# Altium PCB PCB1.PcbDoc
Units mil, origin at the board's own origin, x right, y up, seen from the top; angles counter-clockwise.
Board outline 6000 x 4000 mil, 2 copper layers (Top Layer, Bottom Layer); 39 components, 24 nets, 113 pads, 0 vias.
Unrouted connection lines stored in the file: 89.
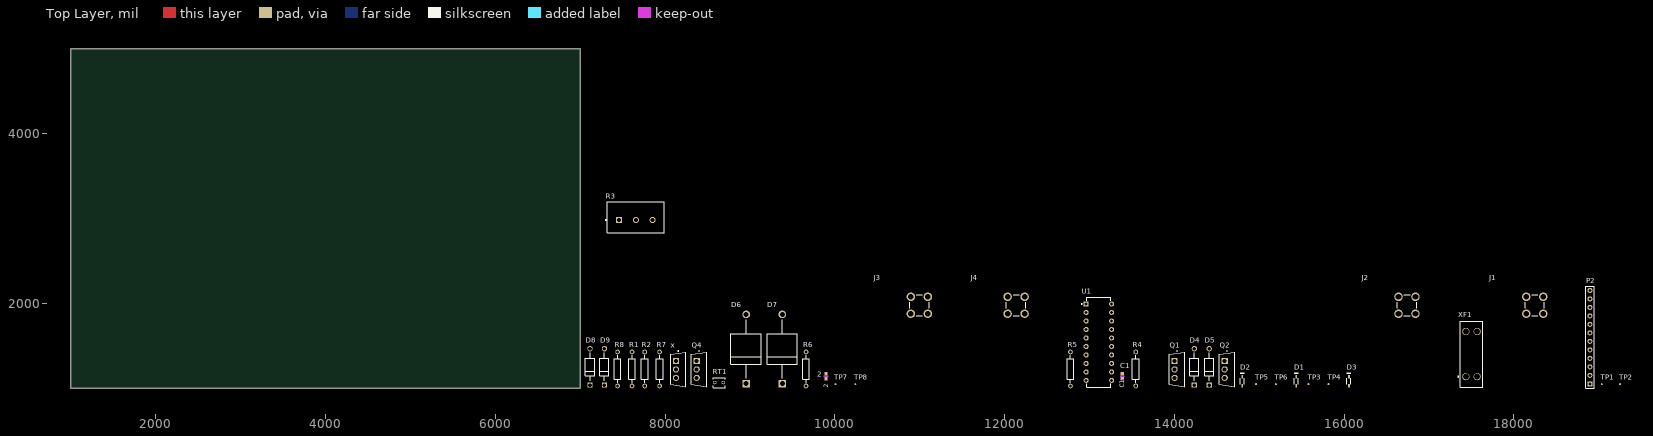
[diagram p0: Top Layer view]
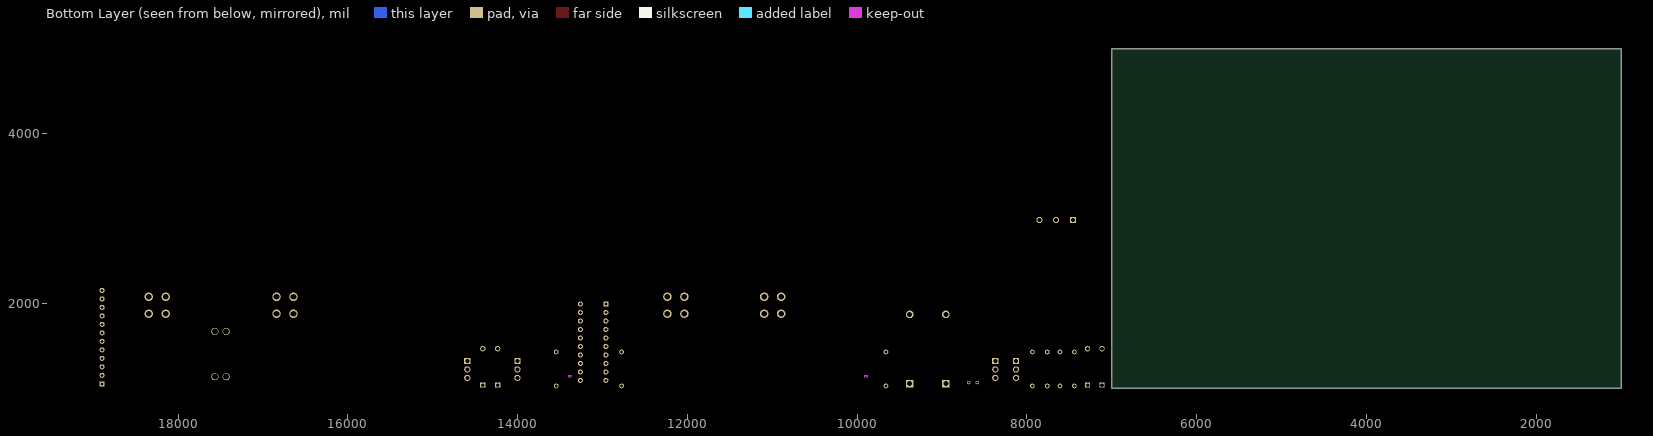
[diagram p1: Bottom Layer view, seen from below]

## Layer stack, top to bottom
Top Solder: solder mask 0.4, Solder Resist, Dk 3.5
Top Layer: signal copper 1.4
Dielectric 1: dielectric 12.6, FR-4, Dk 4.8
Bottom Layer: signal copper 1.4
Bottom Solder: solder mask 0.4, Solder Resist, Dk 3.5

## Board outline
1000,1000 7000,1000 7000,5000 1000,5000

## Design rules (kind name [scope] priority, off if disabled: settings)
Clearance [All] p1: gap=10 ignorepadtopadclearanceinfootprint=FALSE
PolygonConnect [All] p1: connectstyle=Relief reliefconductorwidth=10 reliefentries=4 polygonreliefangle="90 Angle" airgapwidth=10
RoutingVias [All] p1: holewidth=28 width=50 viastyle="Through Hole" minholewidth=28 minwidth=50 maxholewidth=28 maxwidth=50
SolderMaskExpansion [All] p1: expansion=0 istentingtop=FALSE
SupplyNets "Schematic Supply Nets_3" [InNet('+12')] p1: voltage=0.000
SupplyNets "Schematic Supply Nets_2" [InNet('+5')] p2: voltage=0.000
SupplyNets "Schematic Supply Nets_1" [InNet('+24')] p3: voltage=0.000
SupplyNets "Schematic Supply Nets" [InNet('GND')] p4: voltage=0.000
Width [All] p1: maxlimit=10 minlimit=10 preferedwidth=10
30 further rules are at their usual default settings.

## Components (designator, comment, footprint, x,y, rotation, side; value= is the part's Value field where it differs from the comment)
2 "47nF" CAPC17595_95N_KEM 9895,1145 r90 top
C1 "47nF" CAPC17595_95N_KEM 13385,1145 r90 top
D1 "1N4148WS" FAIR-SOD-323_V 15435,1085 r90 top
D2 "1N4148WS" FAIR-SOD-323_V 14800,1085 r90 top
D3 "1N4148WS" FAIR-SOD-323_V 16055,1085 r90 top
D4 "1N5819-E3/54" FP-1N5819-E3-54-MFG 14235,1255 r90 top
D5 "1N5819-E3/54" FP-1N5819-E3-54-MFG 14410,1255 r90 top
D6 "5KP24A-E3/54" FP-P600-MFG 8955,1465 r90 top
D7 "5KP24A-E3/54" FP-P600-MFG 9380,1465 r90 top
D8 "1N5819-E3/54" FP-1N5819-E3-54-MFG 7115,1255 r90 top
D9 "1N5819-E3/54" FP-1N5819-E3-54-MFG 7285,1255 r90 top
J1 "CT3151-2" CALTEST_CT3151-2 18245,1980 r0 top
J2 "CT3151-2" CALTEST_CT3151-2 16740,1980 r0 top
J3 "CT3151-2" CALTEST_CT3151-2 10995,1980 r0 top
J4 "CT3151-2" CALTEST_CT3151-2 12135,1980 r0 top
P2 "Header 12" HDR1X12 18895,1055 r90 top
Q1 "IRFZ34NPBF" FP-PG-TO220-3-MFG 14030,1225 r0 top
Q2 "IRFZ34NPBF" FP-PG-TO220-3-MFG 14620,1225 r0 top
Q4 "IRFZ34NPBF" FP-PG-TO220-3-MFG 8400,1225 r0 top
R1 "Res2" AXIAL-0.4 7610,1230 r90 top value=225K
R2 "Res2" AXIAL-0.4 7760,1230 r90 top value=225K
R3 "10K" TRIM_WH148-1A-2-18T-L20 7655,2985 r0 top
R4 "Res2" AXIAL-0.4 13545,1230 r90 top value=10
R5 "Res2" AXIAL-0.4 12775,1230 r90 top value=10
R6 "Res2" AXIAL-0.4 9660,1230 r90 top value=20K
R7 "Res2" AXIAL-0.4 7935,1230 r90 top value=10
R8 "Res2" AXIAL-0.4 7440,1230 r90 top value=10
RT1 "NTCLE203E3103FB0" VARRB254W40L360T300H900 8635,1070 r0 top
TP1 "TPAD6R" TP06R 19035,1050 r90 top
TP2 "TPAD6R" TP06R 19250,1050 r90 top
TP3 "TPAD6R" TP06R 15580,1050 r90 top
TP4 "TPAD6R" TP06R 15815,1050 r90 top
TP5 "TPAD6R" TP06R 14960,1050 r90 top
TP6 "TPAD6R" TP06R 15195,1050 r90 top
TP7 "TPAD6R" TP06R 10005,1050 r90 top
TP8 "TPAD6R" TP06R 10240,1050 r90 top
U1 "HIP4081AIPZ" DIP762W46P254L2590H533Q20_E20_3_N 13110,1545 r0 top
x "IRFZ34NPBF" FP-PG-TO220-3-MFG 8155,1225 r0 top
XF1 "3557-2" KSTN-3557-2 17500,1405 r90 top

## Footprints (in the part's own frame and the unit in brackets; to place one, negate y for a bottom-side part, rotate by r counter-clockwise, add the part's x,y. Pads: shape width x height; smd on the part's side, far side on the other; paste and mask are expansions set on the pad)
AXIAL-0.4 [mm] "Axial Device, Thru-Hole; 2 Leads; 0.4 in Pin Spacing"
  round 1.4 hole 0.85: 1(-5.08,0) 2(5.08,0)
  silkscreen extent -4.06,-1.02 4.06,1.02
CALTEST_CT3151-2 [mm]
  round 2.55 hole 1.7: 1(-2.54,2.54) 2(2.54,2.54) 3(-2.54,-2.54) 4(2.54,-2.54)
  silkscreen extent -2.9,-3.1 2.9,3.1, body extent -13.85,-6.75 13.85,6.75, height 6.75
CAPC17595_95N_KEM [mm]
  rect 1x0.95 smd paste+0 mask+0: 1(-0.725,0) 2(0.725,0)
  Top Layer keep-out region: -0.174,-0.424 -0.174,0.424 0.174,0.424 0.174,-0.424
  Keep-Out Layer region: -0.174,-0.475 -0.174,0.475 0.174,0.475 0.174,-0.475
  body extent -0.87,-0.48 0.87,0.48, height 0.95
DIP762W46P254L2590H533Q20_E20_3_N [mm] "DIP, Lead Span 7.62mm, Lead Width 0.46mm, Pitch 2.54mm, Body Length 25.90mm, Height 5.33mm, IPC Medium Density"
  rrect25% 1.5x1.5 hole 0.9: 1(-3.81,11.43)
  round 1.5 hole 0.9: 2(-3.81,8.89) 3(-3.81,6.35) 4(-3.81,3.81) 5(-3.81,1.27) 6(-3.81,-1.27) 7(-3.81,-3.81) 8(-3.81,-6.35) 9(-3.81,-8.89) 10(-3.81,-11.43) 11(3.81,-11.43) 12(3.81,-8.89) 13(3.81,-6.35) 14(3.81,-3.81) 15(3.81,-1.27) 16(3.81,1.27) 17(3.81,3.81) 18(3.81,6.35) 19(3.81,8.89) 20(3.81,11.43)
  silkscreen extent -5.23,-13.51 3.62,13.51, body extent -3.95,-12.95 3.95,12.95, height 5.33
FAIR-SOD-323_V [mm] "SODFL, 2-Leads, Body 1.25x1.7mm"
  rect 1.05x0.55 smd: 1(-1.4,0) 2(1.4,0)
  silkscreen extent -0.85,-0.63 2.43,0.63, body extent -1.25,-0.63 1.25,0.63, height 1
FP-1N5819-E3-54-MFG [mm]
  rect 1.6x1.6 hole 1.05 paste-2539.97 mask+0: 1(-5.438,0)
  round 1.6 hole 1.05 paste-2539.97 mask+0: 2(5.438,0)
  silkscreen extent -4.24,-1.35 4.24,1.35, body extent -6.34,-1.45 6.34,1.45, height 0.25
FP-P600-MFG [mm]
  rect 2.3x2.3 hole 1.5 paste-2539.97 mask+0: 1(-10.358,0)
  round 2.3 hole 1.5 paste-2539.97 mask+0: 2(10.358,0)
  silkscreen extent -8.81,-4.55 8.81,4.55, body extent -11.61,-4.65 11.61,4.65, height 0.25
FP-PG-TO220-3-MFG [mm]
  rect 1.85x1.85 hole 1.2 paste-2539.97 mask+0: 1(-0.705,2.54)
  round 1.85 hole 1.2 paste-2539.97 mask+0: 2(-0.705,0) 3(-0.705,-2.54)
  silkscreen extent -2.27,-5.2 2.27,5.62, body extent -2.37,-5.55 2.37,5.55, height 0.25
HDR1X12 [mm] "Connector; Header; 12 Position"
  rect 1.5x1.5 hole 0.9: 1(0,0)
  round 1.5 hole 0.9: 2(2.54,0) 3(5.08,0) 4(7.62,0) 5(10.16,0) 6(12.7,0) 7(15.24,0) 8(17.78,0) 9(20.32,0) 10(22.86,0) 11(25.4,0) 12(27.94,0)
  silkscreen extent -1.27,-1.27 29.21,1.27
KSTN-3557-2 [mm] "Fuse Holder, PCB Mount, Thru-Hole, Body 19.8x6.8mm, Height 7.4mm"
  round 2.15 hole 1.8: 1(-6.75,1.7) 2(-6.75,-1.7) 3(6.75,1.7) 4(6.75,-1.7)
  silkscreen extent -9.9,-3.4 9.9,4.12, body extent -9.91,-3.37 9.91,3.37, height 7.74
TP06R [mm] "Testpoint, round, d=0.6mm"
  round 0.6 smd paste-1: 1(0,0)
TRIM_WH148-1A-2-18T-L20 [mm]
  rect 1.8x1.8 / inner round 1.8 / far side rect 1.8x1.8 hole 1.2 mask+0.102: 1(-5,0)
  round 1.8 hole 1.2 mask+0.102: 2(0,0) 3(5,0)
  silkscreen extent -9.1,-3.8 8.5,5.4, body extent -8.5,-23.8 8.5,5.4, height 21
VARRB254W40L360T300H900 [mm]
  round 1.04 hole 0.64 mask+0.102: 1(-1.27,0) 2(1.27,0)
  silkscreen extent -1.8,-1.5 1.8,1.5, body extent -1.8,-1.5 1.8,1.49, height 9

## Part data
2 C1: library part C0603C473K5RACTU, "SMD Comm X7R, Ceramic, 0.047 uF, 10%, 50 VDC, X7R, SMD, MLCC, Temperature Stable, Class II, 0603", Manufacturer_Name=Kemet, Copyright="Copyright (C) 2026 Ultra Librarian. All rights reserved.", Manufacturer_Part_Number=C0603C473K5RACTU
D1 D2 D3: library part CMP-004-00001-2, "Small Signal Diode, 75 V, 0.15 A, -55 to 150 degC, 2-Pin SOD-323, RoHS, Tape and Reel", Capacitance=-323f, Case/Package=SOD-323, Forward Current=150mA, Forward Voltage=1V, Manufacturer=Fairchild, Max Operating Temperature=150°C, Min Operating Temperature=-55°C, Package Description="2-Pin Small Outline Diode Flat Lead, Body 1.7 x 1.25 mm", Package Quantity=3000, Peak Reverse Current=5uA, Datasheet URL=https://www.fairchildsemi.com/datasheets/1N/1N4148WS.pdf, Datasheet Version="Rev. 1.2, 03/2015", Manufacturer URL=https://www.fairchildsemi.com/, Mounting Technology=SM, Package Reference=SOD-323, Packaging=TapeandReel, Pins=2, Recovery Time=4ns, RoHS Compliant=True
D4 D5 D8 D9: library part CMP-02539-000037-2, "DIODE SCHOTTKY 40V 1A DO204AL", Average Rectified Current=1A, Capacitance=110pF, Forward Voltage=900mV, Max Forward Surge Current (Ifsm)=25A, Max Operating Temperature=125°C, Max Repetitive Reverse Voltage (Vrrm)=40V, Min Operating Temperature=-65°C, Package Quantity=1, Peak Reverse Current=1mA, Current=1A, Current Rating=1A, Diameter=2.7mm, Element Configuration=Single, Forward Current=1A, Height=2.7mm, Lead Free="Lead Free", Length=5.2mm, Max Reverse Voltage (DC)=40V, Mount="Through Hole", Number of Pins=2, Output Current=1A, Packaging="Tape and Reel", Peak Non-Repetitive Surge Current=25A, Polarity=Standard, Radiation Hardening=No, Voltage=40V, Voltage Rating (DC)=40V, Width=2.7mm
D6 D7: library part CMP-00030-42333725-1, "5KP24A-E3/54 5000 W 24 V Uni DirectionalThrough Hole Transient Voltage Suppressor Diode", Breakdown Voltage=26.7V, Case/Package=Axial, Clamping Voltage=38.9V, Leakage Current=2µA, Max Breakdown Voltage=29.5V, Max Junction Temperature (Tj)=175°C, Max Power Dissipation=5kW, Max Surge Current=129A, Min Operating Temperature=-55°C, Operating Supply Voltage=24V, Test Current=5mA, Diameter=9.1mm, Direction=Unidirectional, Element Configuration=Single, Height=9.1mm, Lead Free="Lead Free", Length=9.0932mm, Max Operating Temperature=175°C, Max Reverse Leakage Current=2µA, Min Breakdown Voltage=26.7V, Mount="Through Hole", NexarPartId=42333725, Number of Channels=1, Number of Elements=1, Number of Pins=2, Packaging="Tape & Reel", Peak Pulse Current=129A, Peak Pulse Power=5kW, Polarity=Unidirectional, Power Dissipation=5kW, Radiation Hardening=No, REACH SVHC=Unknown, Reverse Breakdown Voltage=26.7V, Reverse Standoff Voltage=24V, RoHS=Compliant, Schedule B=8541100080, Termination=Axial
J1 J2 J3 J4: "Banana Jack Connector Standard Banana Solder Red", Package=None, Check_prices=https://www.snapeda.com/parts/CT3151-2/Cal+Test+Electronics/view-part/?ref=eda, MF="Cal Test", MP=CT3151-2, SnapEDA_Link=https://www.snapeda.com/parts/CT3151-2/Cal+Test+Electronics/view-part/?ref=snap
P2: "Header, 12-Pin", LatestRevisionDate=17-Jul-2002, LatestRevisionNote="Re-released for DXP Platform.", Publisher="Altium Limited"
Q1 Q2 Q4 x: library part CMP-32901-000547-1, "MOSFET N-CH 55V 29A TO220AB", Case/Package=TO-220, Continuous Drain Current (ID)=29A, Drain to Source Breakdown Voltage=55V, Drain to Source Resistance=40mR, Gate to Source Voltage (Vgs)=20V, Input Capacitance=700pF, Max Operating Temperature=175°C, Max Power Dissipation=68W, Min Operating Temperature=-55°C, Threshold Voltage=4V, Contact Plating=Tin, Drain to Source Voltage (Vdss)=55V, Element Configuration=Single, Halogen Free="Not Halogen Free", Height=0.6inch, Lead Free="Lead Free", Length=0.414inch, Max Dual Supply Voltage=55V, Mount="Through Hole", Number of Pins=3, Packaging=Rail/Tube, Power Dissipation=68W, Rds On Max=40mR, REACH SVHC="No SVHC", Rise Time=49ns, RoHS Compliant=Yes, Turn-Off Delay Time=31ns, Turn-On Delay Time=7ns, Width=0.185inch
R1 R2 R4 R5 R6 R7 R8: "Resistor", LatestRevisionDate=17-Jul-2002, LatestRevisionNote="Re-released for DXP Platform.", PackageDescription="Axial Device, Thru-Hole; 2 Leads; 0.4 in Pin Spacing", PackageReference=AXIAL-0.4, Published=8-Jun-2000, Publisher="Altium Limited"
R3: library part WH148-1A-2-18T-L20, "16mm Rotary Potentiometers", Package=Package, Check_prices=https://www.snapeda.com/parts/WH148-1A-2-18T-L20/Kls+electronics/view-part/?ref=eda, MF="Kls electronics", MP=WH148-1A-2-18T-L20, SnapEDA_Link=https://www.snapeda.com/parts/WH148-1A-2-18T-L20/Kls+electronics/view-part/?ref=snap
RT1: "NTC Thermistors,NTC Ni 0.4 lead 10K 1% bulk e3", Package=None, Check_prices=https://www.snapeda.com/parts/NTCLE203E3103FB0/Vishay/view-part/?ref=eda, MF=Vishay, MP=NTCLE203E3103FB0, SnapEDA_Link=https://www.snapeda.com/parts/NTCLE203E3103FB0/Vishay/view-part/?ref=snap
TP1 TP2 TP3 TP4 TP5 TP6 TP7 TP8: library part CMP-00028-00002-2, "0.6mm round", Pins=1
U1: library part CMP-00572-88252434-2, "Driver 2.5A 4-OUT Hi/Lo Side Full Brdg/Half Brdg Inv/Non-Inv Automotive 20-Pin PDIP Tube", Case/Package=PDIP, Manufacturer Lifecycle Status=ACTIVE, Max Operating Temperature=85°C, Max Output Current=2.5A, Max Output Voltage=15V, Max Power Dissipation=440mW, Max Supply Current=15.5mA, Min Operating Temperature=-40°C, Min Supply Voltage=9.5V, Nominal Supply Current=10.5mA, Output Voltage=12.6V, Switching Frequency=1MHz, ComponentLink1Description="Manufacturer's Website", ComponentLink1URL=http://www.renesas.com, ComponentLink2Description="Datasheet URL", ComponentLink2URL=https://octopart.com/cad-content/api/get-model-datasheet/15189/88252434, ComponentLink3Description="Manufacturer's Package Drawing", ComponentLink3URL=https://www.renesas.com/en/document/psc/e203-20-lead-dual-line-plastic-packages, Export Control Classification Number (ECCN) Code=EAR99, Fall Time=10ns, Height=3.94mm, HelpURL=https://octopart.com/cad-content/api/get-model-datasheet/15189/88252434, Lead Free="Lead Free", Length=26.2mm, Lifecycle Status=Production, Max Supply Voltage=15V, Mount="Through Hole", Number of Channels=4, Number of Drivers=1, Number of Outputs=4, Number of Pins=20, Output Current=2.5A, Overload Protection="Under Voltage", Packaging=Bulk, Pitch=2.5mm, Propagation Delay=30ns, RAM Size=32kB, REACH SVHC=No, Rise Time=10ns, RoHS=Compliant, Turn-Off Delay Time=90ns, Turn-On Delay Time=110ns, Width=6.6mm
XF1: library part CMP-2000-05461-1, "FUSE HOLDER, PCB MOUNT, 500VAC, 20A, ROHS", Current Rating=30A, Manufacturer=Keystone-Electronics, Voltage=500V, Category=CircuitProtection, Contact Finish=TinNickel, Contact Material=Brass, Datasheet URL=http://datasheet.octopart.com/3557-2-Keystone-datasheet-15715937.pdf, Datasheet Version=Apr-13, Family=Fuseholders, For Use With/Related Products=ATC,ATO257,MINI897, Fuse Size="0.43\"Lx0.15\"Wx0.64\"H(10.92mmx3.81mmx16.25mm)", Fuse Type=Blade, Fuseholder Type=Block, Manufacturer URL=http://www.keyelco.com/, Mounting Type=PCB, Number of Circuits=1, Orientation=Vertical, Series=-, Termination Style=PCPin

## Nets (pads, with @x,y where several pads share a name; then routed paths per layer and width w, separated by ;. In a path a pad name is that pad's centre, name@x,y a point inside that pad or via, vN(x,y) a via of type N, cw(c..) or ccw(c..) an arc to the next point about the centre after c; other vN are vias at no path point)
+5: P2.10 P2.11 R3.3 R6.2 TP5.1
+12: D1.1 D2.1 P2.4 TP1.1 U1.2 U1.7 U1.15 U1.16
+24: J1.1 J1.2 J1.3 J1.4 P2.3 TP2.1 XF1.1 XF1.2
GND: D3.1 D6.2 D7.2 D8.2 D9.2 J2.1 J2.2 J2.3 J2.4 P2.1 P2.2 Q4.3 R1.1 R2.1 R3.1 RT1.1 TP6.1 U1.4 U1.14 U1.17 x.3
Net2_1: 2.1 D4.2 D6.1 D8.1 J3.1 J3.2 J3.3 J3.4 Q1.3 R4.2 TP7.1 U1.19 U1.20 x.2
Net2_2: 2.2 D1.2 U1.1
NetC1_1: C1.1 D5.2 D7.1 D9.1 J4.1 J4.2 J4.3 J4.4 Q2.3 Q4.2 R5.1 TP8.1 U1.11 U1.12
NetC1_2: C1.2 D2.2 U1.10
NetD3_2: D3.2 D4.1 D5.1 Q1.2 Q2.2 XF1.3 XF1.4
NetP2_5: P2.5 U1.6
NetP2_6: P2.6 U1.5
NetP2_7: P2.7 U1.3
NetP2_8: P2.8 TP4.1
NetP2_9: P2.9 TP3.1
NetP2_12: P2.12 R3.2
NetQ1_1: Q1.1 R4.1
NetQ2_1: Q2.1 R5.2
NetQ4_1: Q4.1 R8.2
NetR1_2: R1.2 U1.8
NetR2_2: R2.2 U1.9
NetR6_1: R6.1 RT1.2
NetR7_1: R7.1 x.1
NetR7_2: R7.2 U1.18
NetR8_1: R8.1 U1.13